# Altium PCB Electrode_35x30_5x6_D2p5.PcbDoc
Units mm, origin at the board's own origin, x right, y up, seen from the top; angles counter-clockwise.
Board outline 35 x 30 mm, 2 copper layers (Top Layer, Bottom Layer); 7 components, 6 nets, 46 pads, 2 vias.
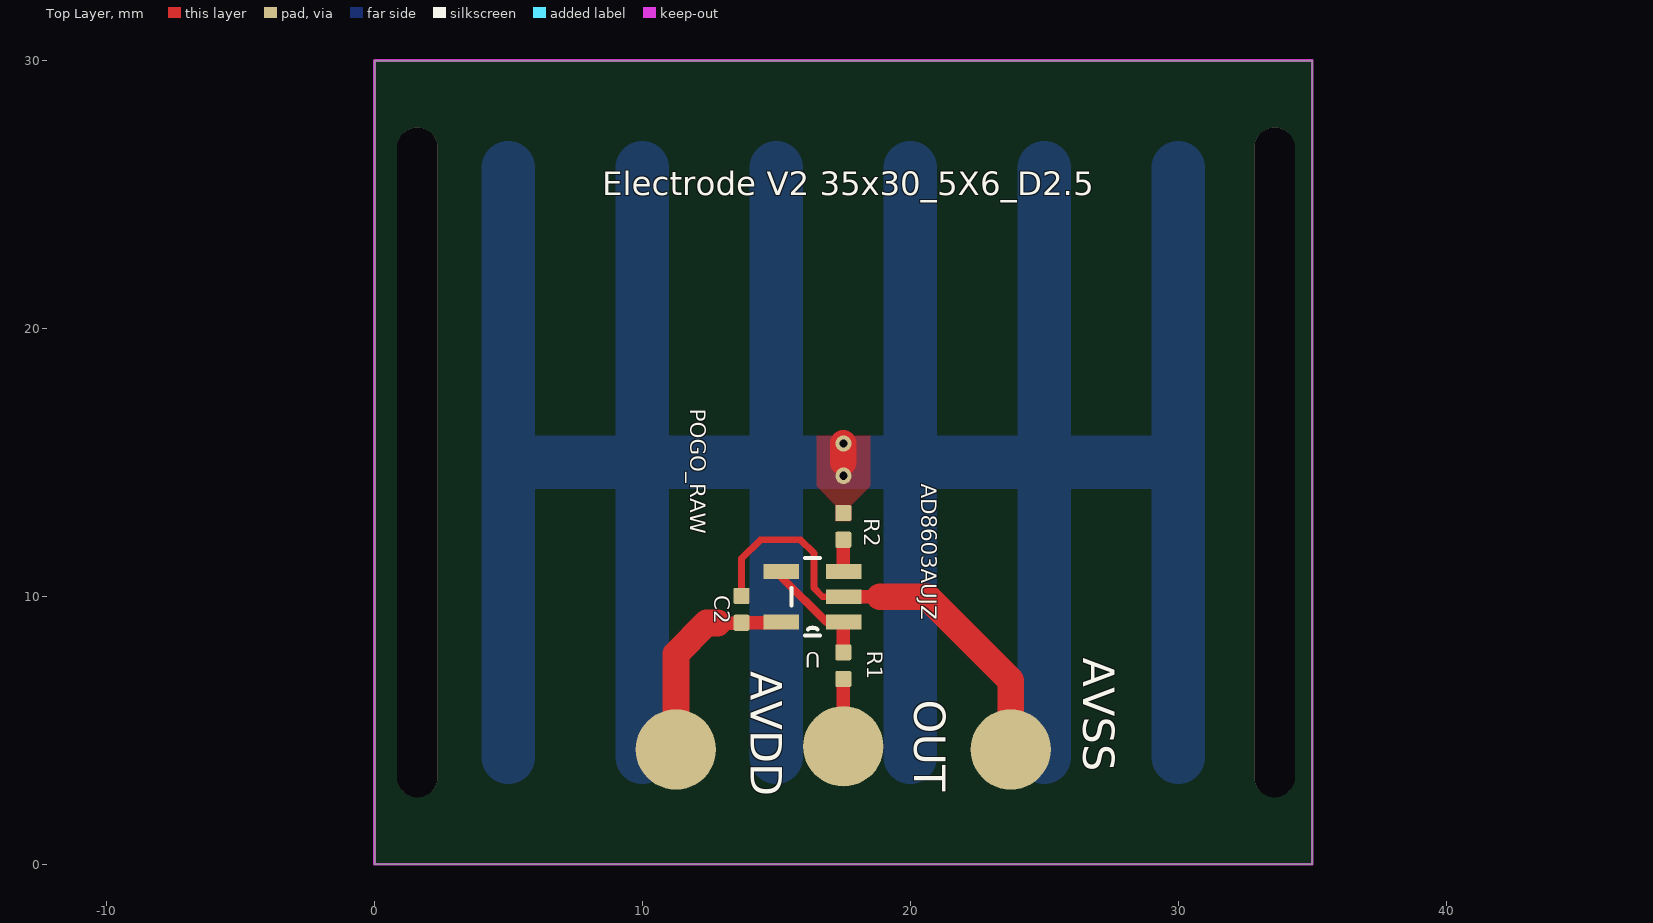
[diagram p0: Top Layer view]
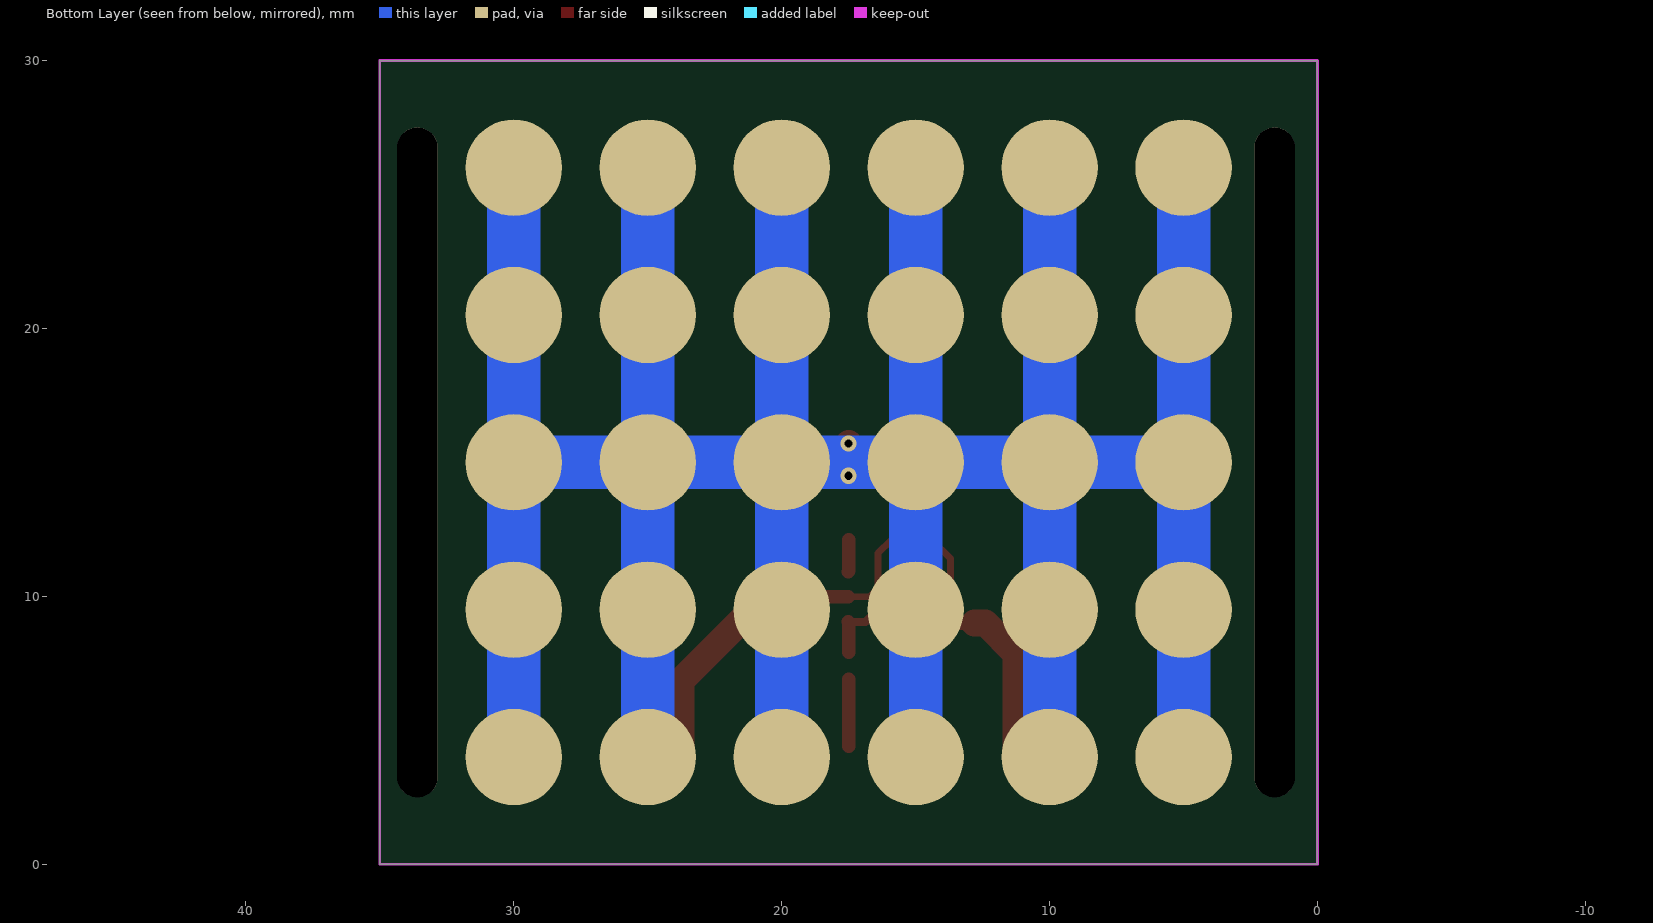
[diagram p1: Bottom Layer view, seen from below]
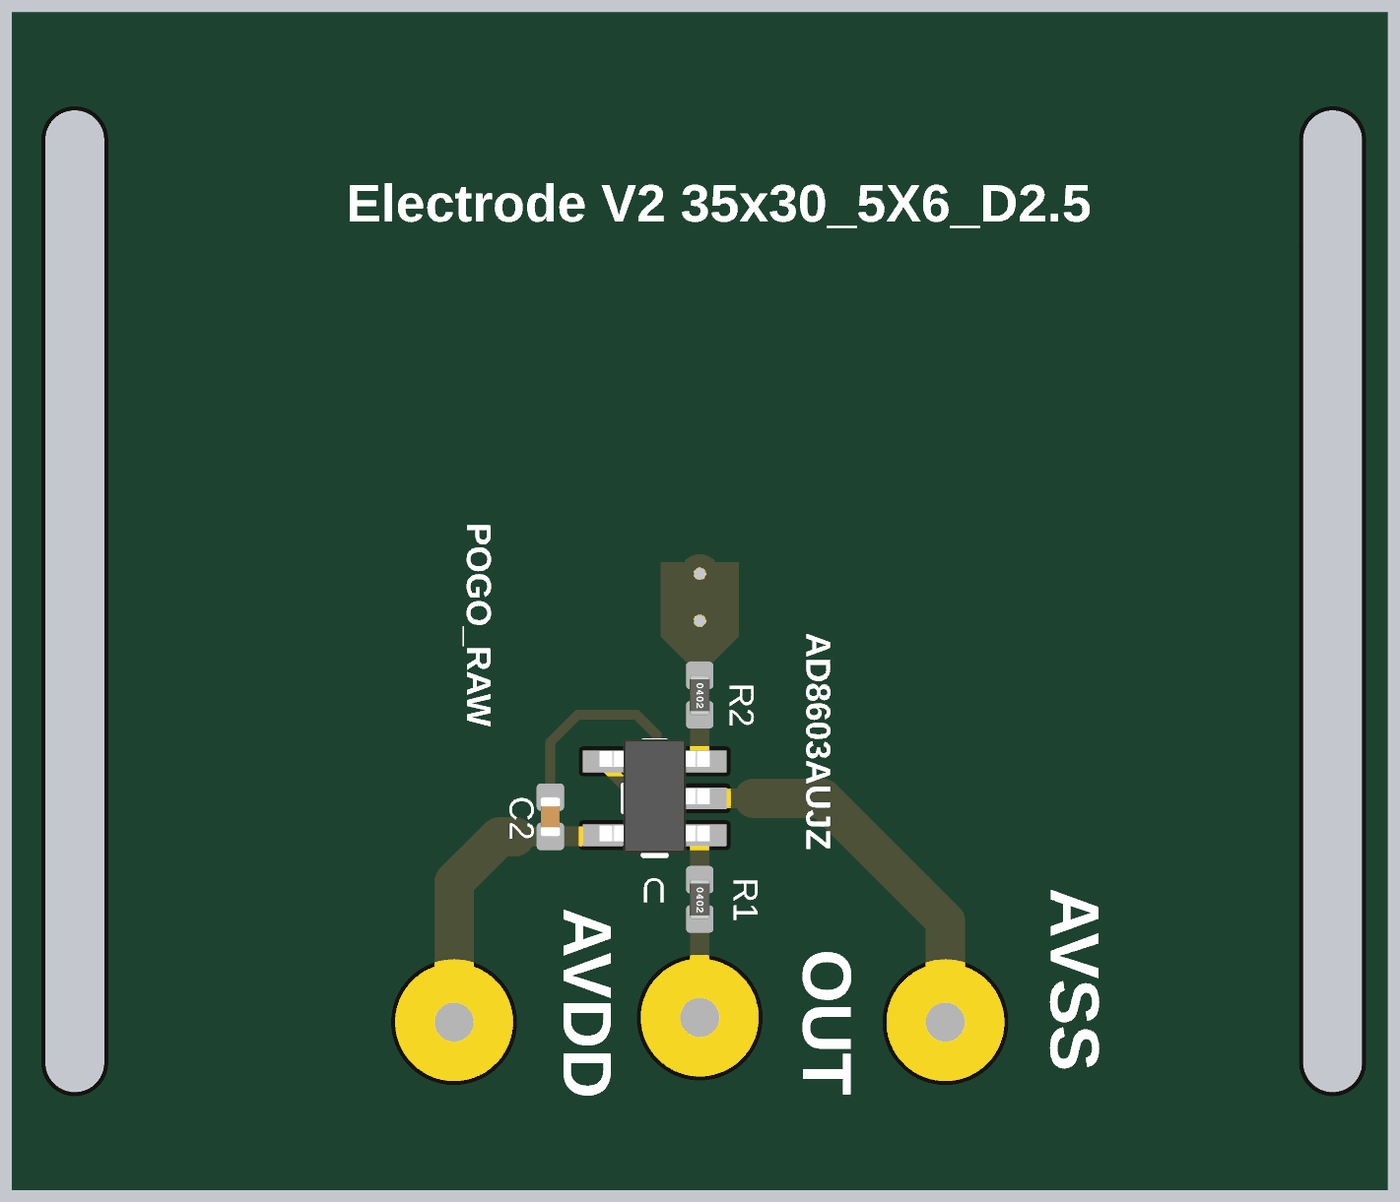
[diagram p2: 3D render of the assembled board from above, using the file's embedded part models]

## Layer stack, top to bottom
Top Solder: solder mask 0.0102, Solder Resist, Dk 3.5
Top Layer: signal copper 0.0356
Dielectric 1: dielectric 0.32, FR-4, Dk 4.8
Bottom Layer: signal copper 0.0356
Bottom Solder: solder mask 0.0102, Solder Resist, Dk 3.5

## Board outline
0,0 0,30 35,30 35,0

## Design rules (kind name [scope] priority, off if disabled: settings)
Clearance [All] p1: gap=0.254 ignorepadtopadclearanceinfootprint=FALSE
PolygonConnect [All] p1: connectstyle=Direct reliefconductorwidth=0.254 reliefentries=4 polygonreliefangle="90 Angle" airgapwidth=0.254
RoutingVias [All] p1: holewidth=0.711 width=1.27 viastyle="Through Hole" minholewidth=0.3 minwidth=0.6 maxholewidth=0.711 maxwidth=1.27
SolderMaskExpansion [All] p1: expansion=0.102 istentingtop=FALSE
SupplyNets "Schematic Supply Nets_1" [InNet('AVSS')] p1: voltage=0.000
SupplyNets "Schematic Supply Nets" [InNet('AVDD')] p2: voltage=0.000
Width [All] p1: maxlimit=2 minlimit=0.254 preferedwidth=0.254
30 further rules are at their usual default settings.

## Classes and differential pairs
component class Electrode_35x25_4x5_D2: AVDD C2 OUT R1 R2 U

## Components (designator, comment, footprint, x,y, rotation, side; value= is the part's Value field where it differs from the comment)
AVDD "AVDD" "TESTPOINT 1.2MM"#1 13.922,4.183 r0 top (schematic designator TP1)
AVSS "AVSS" "TESTPOINT 1.2MM"#2 27.022,4.483 r0 top (schematic designator TP3)
C2 "" C0402L 13.7,9.512 r90 top
OUT "OUT" "TESTPOINT 1.2MM"#3 18.143,4.45 r0 top (schematic designator TP2)
R1 "100R" R0402L 17.5,7.409 r270 top
R2 "56K" R0402L 17.5,12.609 r270 top
U "AD8603AUJZ-R2" SOT95P280X100-5N 16.354,9.983 r180 top

## Footprints (in the part's own frame and the unit in brackets; to place one, negate y for a bottom-side part, rotate by r counter-clockwise, add the part's x,y. Pads: shape width x height; smd on the part's side, far side on the other; paste and mask are expansions set on the pad)
C0402L [mm]
  rrect20% 0.6x0.6 smd paste+0.05 mask+0.05: 1(-0.5,0) 2(0.5,0)
  body extent -0.5,-0.25 0.5,0.25, height 0.49
R0402L [mm]
  rrect20% 0.6x0.6 smd paste+0.05 mask+0.05: 1(-0.5,0) 2(0.5,0)
  body extent -0.51,-0.25 0.51,0.25, height 0.51
SOT95P280X100-5N [mil]
  rect 52x22 smd: 1(-46,37) 2(-46,0) 3(-46,-37) 4(46,-37) 5(46,37)
  silkscreen extent -11,-57 31,57, body extent -55,-59 55,55, height 39
"TESTPOINT 1.2MM"#1 [mm]
  round 3 smd paste-1 mask+0.1: 1(-2.672,0.1)
"TESTPOINT 1.2MM"#2 [mm]
  round 3 smd paste-1 mask+0.1: 1(-3.272,-0.2)
"TESTPOINT 1.2MM"#3 [mm]
  round 3 smd paste-1 mask+0.1: 1(-0.643,-0.05)

## Part data
AVDD AVSS OUT: library part "Test point", "Test point", Value1=N/A, Value2=N/A
C2: library part C0402_1, "CAP 0402 100nF 16V Y5V", MPN=CL05B104KO5NNNC, Value1=100nF, Value2=16V, Comment Description="Cap 0.1uF 16V 0402", Manu="Samsung Electro-Mechanics", Type=Capacitor
R1 R2: library part R0402_4_1, Case=0603, MPN="FRC0603J2R0 TS", Value1=2R, Value2=100mW, Comment Description="2Ω ±5% 100mW 0603 Thick Film Resistor", Manu=FOJAN, Type=Resistor
U: "General Purpose Amplifier 1 Circuit Rail-to-Rail TSOT-5", Package="TSOT-5 Analog Devices", Availability=Unavailable, MF="Analog Devices", MP=AD8603AUJZ-R2, Price=None, SnapEDA_Link=https://www.snapeda.com/parts/AD8603AUJZ-R2/Analog%20Devices/view-part/574456/?ref=snap

## Free pads (board coordinates)
  round 3.6 smd far side paste-2539.97: 1(5,4) 1(5,9.5) 1(5,15) 1(5,20.5) 1(5,26) 2(10,4) 2(10,9.5) 2(10,15) 2(10,20.5) 2(10,26) 3(15,4) 3(15,9.5) 3(15,15) 3(15,20.5) 3(15,26) 4(20,4) 4(20,9.5) 4(20,15) 4(20,20.5) 4(20,26) 5(25,4) 5(25,9.5) 5(25,15) 5(25,20.5) 5(25,26) 6(30,4) 6(30,9.5) 6(30,15) 6(30,20.5) 6(30,26)
  oval 1.5x25 hole 1.5 slot 25 at 90 deg unplated paste-2539.97: 20(1.6,15) 20(33.6,15)

## Via types
v1: diameter 0.6, hole 0.3, Top Layer to Bottom Layer, tented both sides, 2 vias

## Nets (pads, with @x,y where several pads share a name; then routed paths per layer and width w, separated by ;. In a path a pad name is that pad's centre, name@x,y a point inside that pad or via, vN(x,y) a via of type N, cw(c..) or ccw(c..) an arc to the next point about the centre after c; other vN are vias at no path point)
AVDD: AVDD.1 C2.1 U.5 | length 8
  Top Layer w0.5: 12.8,9 13.688,9 C2.1 15.155,9.012 U.5
  Top Layer w1: AVDD.1 11.25,7.85 12.4,9 12.8,9
AVSS: AVSS.1 C2.2 U.2 | length 17.2
  Top Layer w0.254: C2.2@13.7,10.109 13.7,11.409 14.4,12.109 15.9,12.109 16.4,11.609 16.4,10.309 16.726,9.983 U.2
  Top Layer w0.5: U.2 18.874,9.983
  Top Layer w1: 18.874,9.983 20.626,9.983 23.75,6.859 AVSS.1
NetR1_1: R1.1 U.1 U.4 | length 4.4
  Top Layer w0.3: U.4 15.186,10.724 16.866,9.043 U.1
  Top Layer w0.5: R1.1 17.5,9.021 U.1
NetR2_2: R2.2 U.3 | length 1.2
  Top Layer w0.5: R2.2 17.5,10.945 U.3
POGO_RAW: pad.1 pad.2 pad.3 pad.4 pad.5 pad.6 R2.1 | length 157.7
  Top Layer w1: 17.5,15 v1(17.5,15.7)
  Bottom Layer w2: pad.1@5,4 5,9.5 pad.1@5,15 ; pad.1@5,26 5,20.5 pad.1@5,15 ; pad.2@10,4 10,9.5 10,15 10,20.5 pad.2@10,26 ; pad.3@15,4 15,9.5 15,15 15,20.5 pad.3@15,26 ; pad.4@20,4 20,9.5 20,15 20,20.5 pad.4@20,26 ; pad.5@25,4 25,9.5 25,15 25,20.5 pad.5@25,26 ; pad.6@30,4 30,9.5 pad.6@30,15 ; pad.6@30,26 30,20.5 pad.6@30,15 ; pad.1@5,15 pad.6@30,15
  other v1: 17.5,14.5
SIGNAL_OUT: OUT.1 R1.2 | length 2.5
  Top Layer w0.5: OUT.1 R1.2

## Polygon pours and split planes (outlines as drawn)
POGO_RAW on Top Layer "POGO_RAW_L01_P000" (solid, remove dead copper, pour order 0): 17.8,12.8 17.2,12.8 17.2,13.4 16.5,14.1 16.5,16 18.5,16 18.5,14.1 17.8,13.4

## Keep-outs
Keep-Out Layer:
  the board outline again, w0.1

## Silkscreen, mask and mechanical layers (free items; w line width, h text height)
Top Overlay:
  text "Electrode V2 35x30_5X6_D2.5" at 8.5,24.669 h1.52
  text "POGO_RAW" at 11.577,17 h1 r270
  text "AD8603AUJZ" at 20.212,14.2 h1 r270